# Altium PCB PCB v1.0.PcbDoc
Units mm, origin at the board's own origin, x right, y up, seen from the top; angles counter-clockwise.
Board outline 12.95 x 9.78 mm, 2 copper layers (Top Layer, Bottom Layer); 6 components, 5 nets, 20 pads, 7 vias.
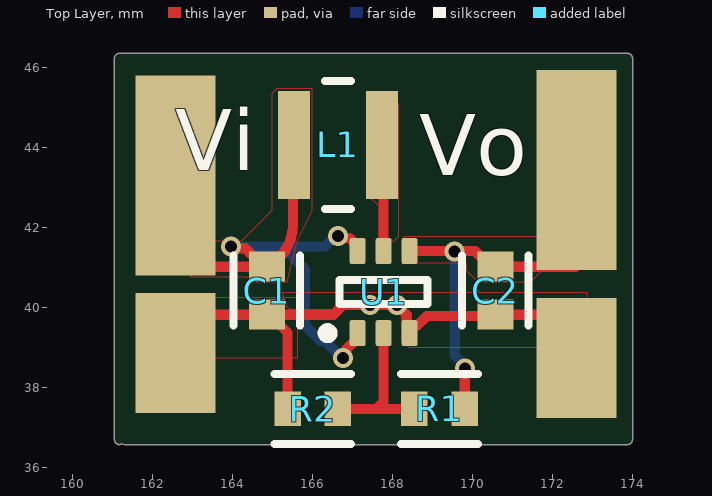
[diagram p0: Top Layer view]
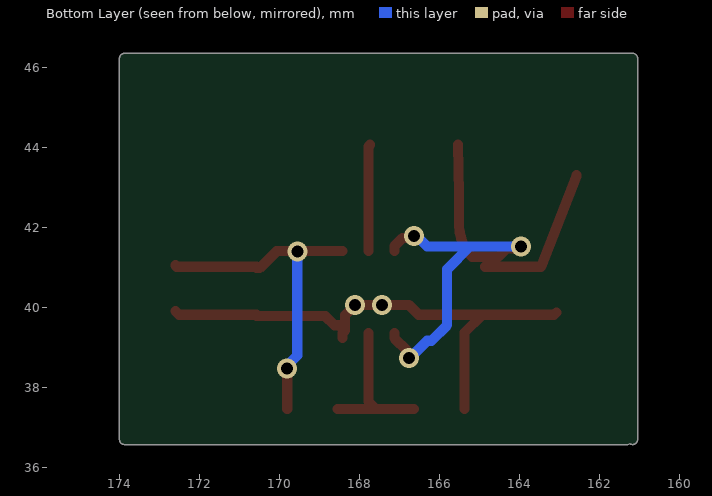
[diagram p1: Bottom Layer view, seen from below]
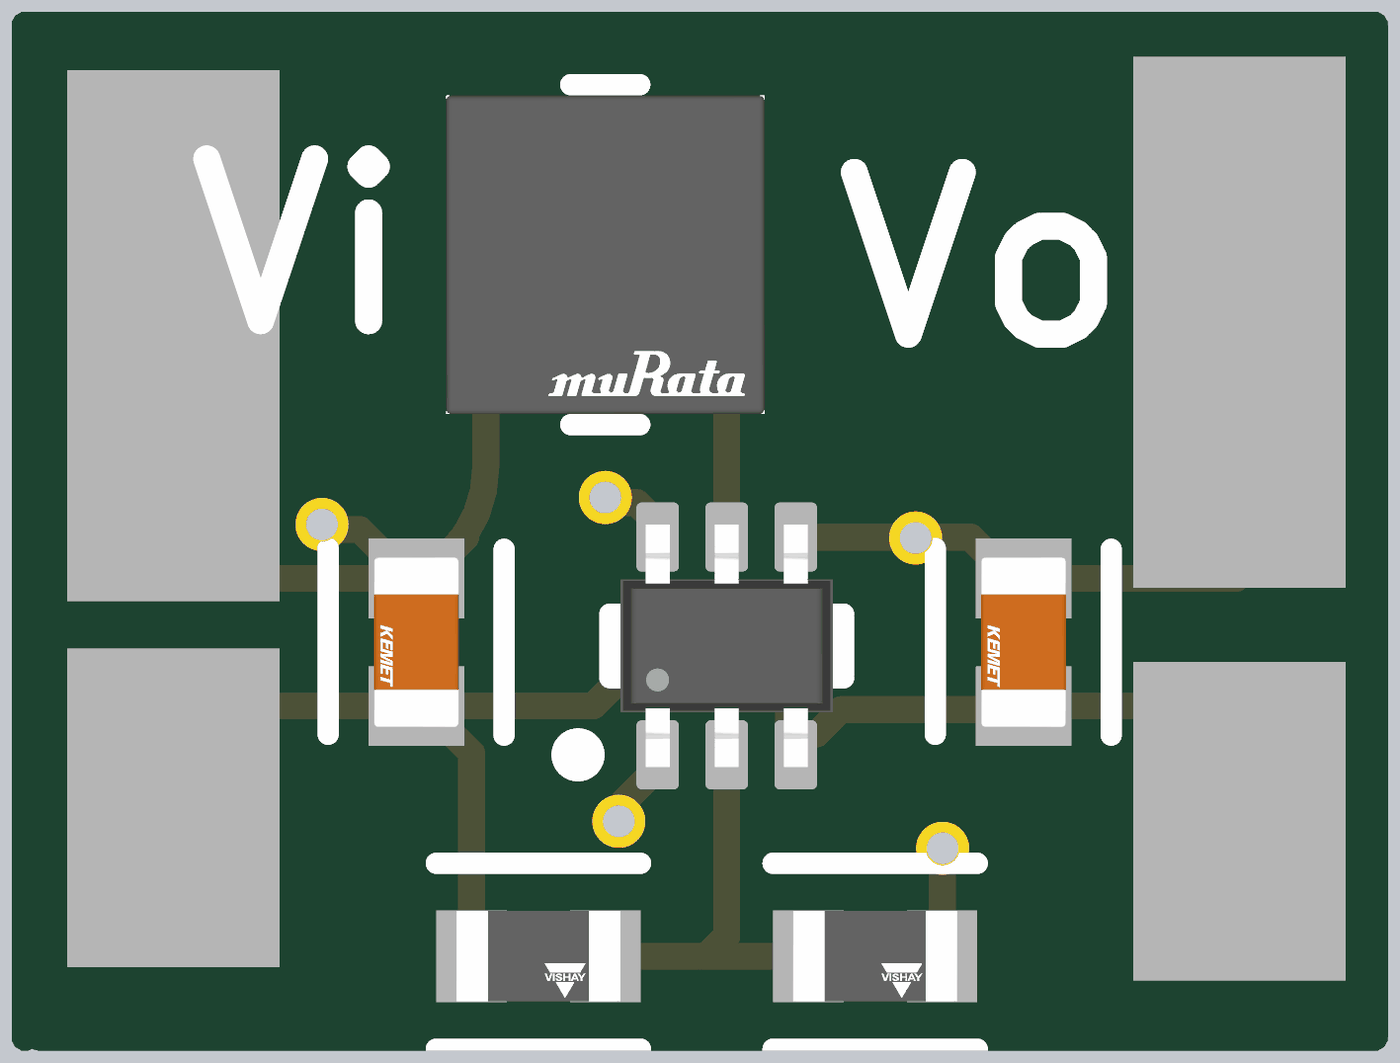
[diagram p2: 3D render of the assembled board from above, using the file's embedded part models]

## Layer stack, top to bottom
Top Solder: solder mask 0.0102, Solder Resist, Dk 3.5
Top Layer: signal copper 0.0356
Dielectric 1: dielectric 0.32, FR-4, Dk 4.8
Bottom Layer: signal copper 0.0356
Bottom Solder: solder mask 0.0102, Solder Resist, Dk 3.5

## Board outline
161.036,36.703 161.036,46.228 cw(c161.163,46.228) 161.163,46.355 173.863,46.355 cw(c173.863,46.228) 173.99,46.228 173.99,36.703 cw(c173.863,36.703) 173.863,36.576 161.29,36.576 161.226,36.593 cw(c161.163,36.703)

## Design rules (kind name [scope] priority, off if disabled: settings)
Clearance [All] p1: gap=0.254 ignorepadtopadclearanceinfootprint=FALSE except(0.1: Arc-Arc Arc-Track Arc-SMDPad Arc-THPad Track-Track Track-SMDPad Track-THPad SMDPad-SMDPad SMDPad-Via)
PolygonConnect [All] p1: connectstyle=Relief reliefconductorwidth=0.254 reliefentries=4 polygonreliefangle="90 Angle" airgapwidth=0.254
RoutingVias [All] p1: holewidth=0.711 width=1.27 viastyle="Through Hole" minholewidth=0.15 minwidth=0.25 maxholewidth=0.711 maxwidth=1.27
SolderMaskExpansion [All] p1: expansion=0 istentingtop=FALSE
SupplyNets "Schematic Supply Nets" [InNet('GND')] p1: voltage=0.000
Width [All] p1: maxlimit=0.254 minlimit=0.254 preferedwidth=0.254
30 further rules are at their usual default settings.

## Components (designator, comment, footprint, x,y, rotation, side; value= is the part's Value field where it differs from the comment)
C1 "C0603C106M9PACTU" FP-C0603C106M9PACTU-MFG 164.846,40.421 r270 top value=10uF
C2 "C0603C106M9PACTU" FP-C0603C106M9PACTU-MFG 170.561,40.421 r270 top value=10uF
L1 "LQH3NPN4R7MMEL" FP-LQH3NPH_ME-MFG 166.624,44.069 r0 top
R1 "MCT0603PD1001DP500" FP-MCT0603-IPC_C 169.164,37.465 r0 top
R2 "MCT0603PD1001DP500" FP-MCT0603-IPC_C 165.995,37.465 r0 top
U1 "TPS61222DCKR" DCK0006A_L 167.767,40.386 r90 top

## Footprints (in the part's own frame and the unit in brackets; to place one, negate y for a bottom-side part, rotate by r counter-clockwise, add the part's x,y. Pads: shape width x height; smd on the part's side, far side on the other; paste and mask are expansions set on the pad)
DCK0006A_L [mm] "SOT23, 6-Leads, Body 2.15x1.4mm, Pitch 0.65mm, IPC High Density"
  rrect25% 0.65x0.4 smd: 1(-1.025,0.65) 2(-1.025,0) 3(-1.025,-0.65) 4(1.025,-0.65) 5(1.025,0) 6(1.025,0.65)
  silkscreen extent -1.15,-1.1 0.3,1.52, body extent -1.14,-1 1.14,1, height 0.94
FP-C0603C106M9PACTU-MFG [mm]
  rect 0.75x0.9 smd paste+0 mask+0: 1(-0.6,0) 2(0.6,0)
  silkscreen extent -0.88,-0.83 0.87,0.82, body extent -1.2,-0.6 1.2,0.6, height 0.25
FP-LQH3NPH_ME-MFG [mm]
  rect 0.8x2.7 smd paste+0 mask+0: 1(-1.1,0) 2(1.1,0)
  silkscreen extent -0.33,-1.6 0.33,1.6, body extent -1.7,-1.7 1.7,1.7, height 0.25
FP-MCT0603-IPC_C [mm]
  rect 0.664x0.862 smd paste+0 mask+0: 1(-0.629,0) 2(0.629,0)
  silkscreen extent -0.96,-0.87 0.96,0.87, body extent -1.06,-0.58 1.06,0.58, height 0.25

## Part data
C1 C2: library part CMP-2006-02285-3, "CAP CER 10UF 6.3V X5R 0603", Capacitance=10uF, Manufacturer=Kemet, Temperature="-55°C to +85°C", Temperature Characteristic=X5R, Temperature Coefficient=15%, Temperature Range High=+85°C, Temperature Range Low=-55°C, Tolerance=20%, Voltage Rating=6.3V, Automotive=No, Category=Cap, ComponentLink2Description=Datasheet, ComponentLink2URL=http://www.kemet.com/Lists/ProductCatalog/Attachments/19/KEM_C1006_X5R_SMD.pdf, Device Class L1="Passive Components", Device Class L2=Capacitors, Device Class L3="Ceramic Capacitors", Digikey Description="CAP CER 10UF 6.3V X5R 0603", Height=0.9mm, Ipc Land Pattern Name=CAPC16080X80, Lead Free=Yes, Manufacturer Part Number=C0603C106M9PACTU, Material=Ceramic, Mouser Description="In a Pack of 10, KEMET 0603 (1608M) 10µF MLCC 6.3V dc ±20% SMD C0603C106M9PACTU", Octopart=https://octopart.com/c0603c106m9pactu-kemet-8375727, Package=C0603C106M9PACTU, RoHS=TRUE
L1: library part CMP-06042-001724-1, "Wire Wound Ferrite Inductor for Power Lines 4.7μH ±20% 0.12Ω 1700mA 1212", Case Code (Imperial)=1212, Case Code (Metric)=3030, Current Rating=1A, DC Resistance (DCR)=120mR, Inductance=4.7uH, Max Operating Temperature=105°C, Min Operating Temperature=-40°C, Resistor Type=Wirewound, Saturation Current=1.3A, Self Resonant Frequency=40MHz, Test Frequency=1MHz, Tolerance=20%, Case/Package=1212, Core Material=Ferrite, Mount="Surface Mount", Packaging="Cut Tape", Shielding=Shielded
R1 R2: library part CMP-02407-000265-1, "RES SMD 100 OHM 1% 1/8W 0603", Case Code (Imperial)=0603, Case Code (Metric)=1608, Max Operating Temperature=175°C, Max Power Dissipation=250mW, Min Operating Temperature=-55°C, Resistance=1kR, Temperature Coefficient=25ppm/°C, Tolerance=0.5%, Case/Package=0603, Composition="Thin Film", Features="Automotive AEC-Q200", Number of Terminations=2, Packaging="Tape and Reel"
U1: library part CMP-0347-00055-2, "Boost Voltage Converter with 0.7 to 5.5 V Input and 5 V Output, -40 to 85 degC, 6-Pin SC70 (DCK), Green (RoHS & no Sb/Br)", Manufacturer="Texas Instruments", Switching Frequency(Max)(kHz)=2000, Code_JEDEC=MO-203-AB, ComponentLink1Description=Datasheet, ComponentLink1URL=http://www.ti.com/general/docs/lit/getliterature.tsp?genericPartNumber=TPS61222&fileType=pdf, ComponentLink2Description="Package Specification", ComponentLink2URL=http://www.ti.com/litv/pdf/mpds114c, DatasheetVersion=SLVS776, Eco-Plan="Green (RoHS & no Sb/Br)", Mounting Technology="Surface Mount", PackageDescription="6-Pin Plastic Small-Outline Package, 2 x 1.3 mm Body, 0.65 mm Pitch, 2.1 mm Lead Span", PackageReference=DCK0006A, PackageVersion="revG, Jan-2007", PartNumber=TPS61222DCKR, Regulated Outputs(#)=1, SubFamily="Step-Up Regulator", Topology=Boost, Vin(Max)(V)=5.5, Vin(Min)(V)=0.7, Vout(Max)(V)=5, Vout(Min)(V)=5

## Free pads (board coordinates)
  rect 2x3 smd paste+0 mask+0: 5(162.56,38.862) 5(172.593,38.735)
  rect 2x5 smd paste+0 mask+0: 5(162.56,43.307) 5(172.593,43.434)

## Via types
v1: diameter 0.5, hole 0.3, Top Layer to Bottom Layer, 7 vias

## Nets (pads, with @x,y where several pads share a name; then routed paths per layer and width w, separated by ;. In a path a pad name is that pad's centre, name@x,y a point inside that pad or via, vN(x,y) a via of type N, cw(c..) or ccw(c..) an arc to the next point about the centre after c; other vN are vias at no path point)
GND: C1.2 C2.2 pad.5@162.56,38.862 pad.5@172.593,38.735 R2.1 U1.3 | length 13.1
  Top Layer w0.254: pad.5@163.068,39.878 163.125,39.821 C1.2 ; R2.1 165.365,39.377 164.921,39.821 C1.2 ; U1.3@168.417,39.236 U1.3 168.348,39.43 168.348,39.815 v1(168.096,40.067) v1(167.425,40.067) 166.755,40.067 166.509,39.821 C1.2 ; U1.3@168.417,39.486 168.49,39.559 168.615,39.559 168.842,39.786 C2.2@170.561,39.786 ; C2.2 172.501,39.821 pad.5@172.593,39.913
NetL1_2: L1.2 U1.5 | length 2.7
  Top Layer w0.254: L1.2 167.767,44.026 U1.5
NetR1_1: R1.1 R2.2 U1.2 | length 3.9
  Top Layer w0.254: R2.2 167.579,37.465 ; U1.2 167.767,37.653 167.579,37.465 ; R1.1 167.579,37.465
Vin: C1.1 L1.1 pad.5@162.56,43.307 U1.1 U1.6 | length 16
  Top Layer w0.254: pad.5@162.56,43.307 163.449,41.021 C1.1 ; v1(163.957,41.529) 164.004,41.482 164.31,41.482 164.523,41.269 C1.1@165.169,41.269 ; 165.311,41.411 C1.1@165.169,41.269 ; L1.1 165.498,42.846 165.498,42.065 cw(c164.374,42.064) C1.1@165.169,41.269 ; v1(166.624,41.783) 166.671,41.736 166.917,41.736 167.117,41.536 U1.6 ; v1(166.751,38.735) 166.798,38.782 166.798,38.917 167.117,39.236 U1.1
  Bottom Layer w0.254: v1(163.957,41.529) 165.227,41.529 ; v1(166.624,41.783) 166.557,41.783 166.303,41.529 165.227,41.529 ; v1(166.751,38.735) 166.731,38.735 166.295,39.171 166.188,39.171 165.798,39.56 165.798,40.957 165.227,41.529
Vout: C2.1 pad.5@172.593,43.434 R1.2 U1.4 | length 8.4
  Top Layer w0.254: U1.4 170.061,41.411 170.486,40.986 C2.1@170.561,40.986 ; R1.2 169.796,37.468 169.796,38.478 v1(169.799,38.481) ; C2.1 172.558,41.021 pad.5@172.593,41.056
  Bottom Layer w0.254: v1(169.545,41.402) 169.545,38.802 169.799,38.548 v1(169.799,38.481)

## Polygon pours and split planes (outlines as drawn)
Vin on Top Layer "VIN_L01_P001" (solid, pour order 1): 162.941,40.767 164.338,40.767 164.465,40.64 165.354,40.64 165.608,41.656 165.989,42.418 165.989,45.466 165.1,45.466 164.973,45.339 164.973,42.418 164.211,41.656 162.941,41.656
Vout on Top Layer "VOUT_L01_P005" (solid, pour order 5): 168.238,41.086 168.271,41.119 169.834,41.119 169.834,40.927 170.115,40.646 171.458,40.646 171.458,40.663 171.733,40.938 171.733,41.775 168.298,41.775 168.249,41.725
GND on Top Layer "GND_L01_P003" (solid, pour order 3): 165.227,40.386 172.847,40.386 172.847,38.989 168.402,38.989 168.222,39.169 168.222,39.941 165.418,39.941 165.354,40.005
NetL1_2 on Top Layer "NETL1_2_L01_P002" (solid, pour order 2): 167.386,42.799 167.64,42.545 167.64,41.656 168.021,41.656 168.148,41.783 168.148,45.085 167.767,45.085 167.386,45.085
GND on Top Layer "GND_L01_P000" (solid, pour order 0): 162.941,40.259 165.608,40.259 165.608,38.735 165.481,38.735 162.941,38.735 162.941,39.116

## Silkscreen, mask and mechanical layers (free items; w line width, h text height)
Top Overlay:
  text "Vi" at 162.56,43.434 h1.52
  text "Vo" at 168.656,43.307 h1.52
Mechanical 1:
  lines w0.254: 161.163,36.703 161.163,46.228 173.863,46.228 173.863,36.703 161.29,36.703